# Altium PCB Driver.PcbDoc (part 3 of 4)
Units mm, origin at the board's own origin, x right, y up, seen from the top; angles counter-clockwise.
Board outline 200.2 x 290.2 mm, 2 copper layers (Top Layer, Bottom Layer), stack 1.371 mm thick; 539 components, 196 nets, 1470 pads, 343 vias.
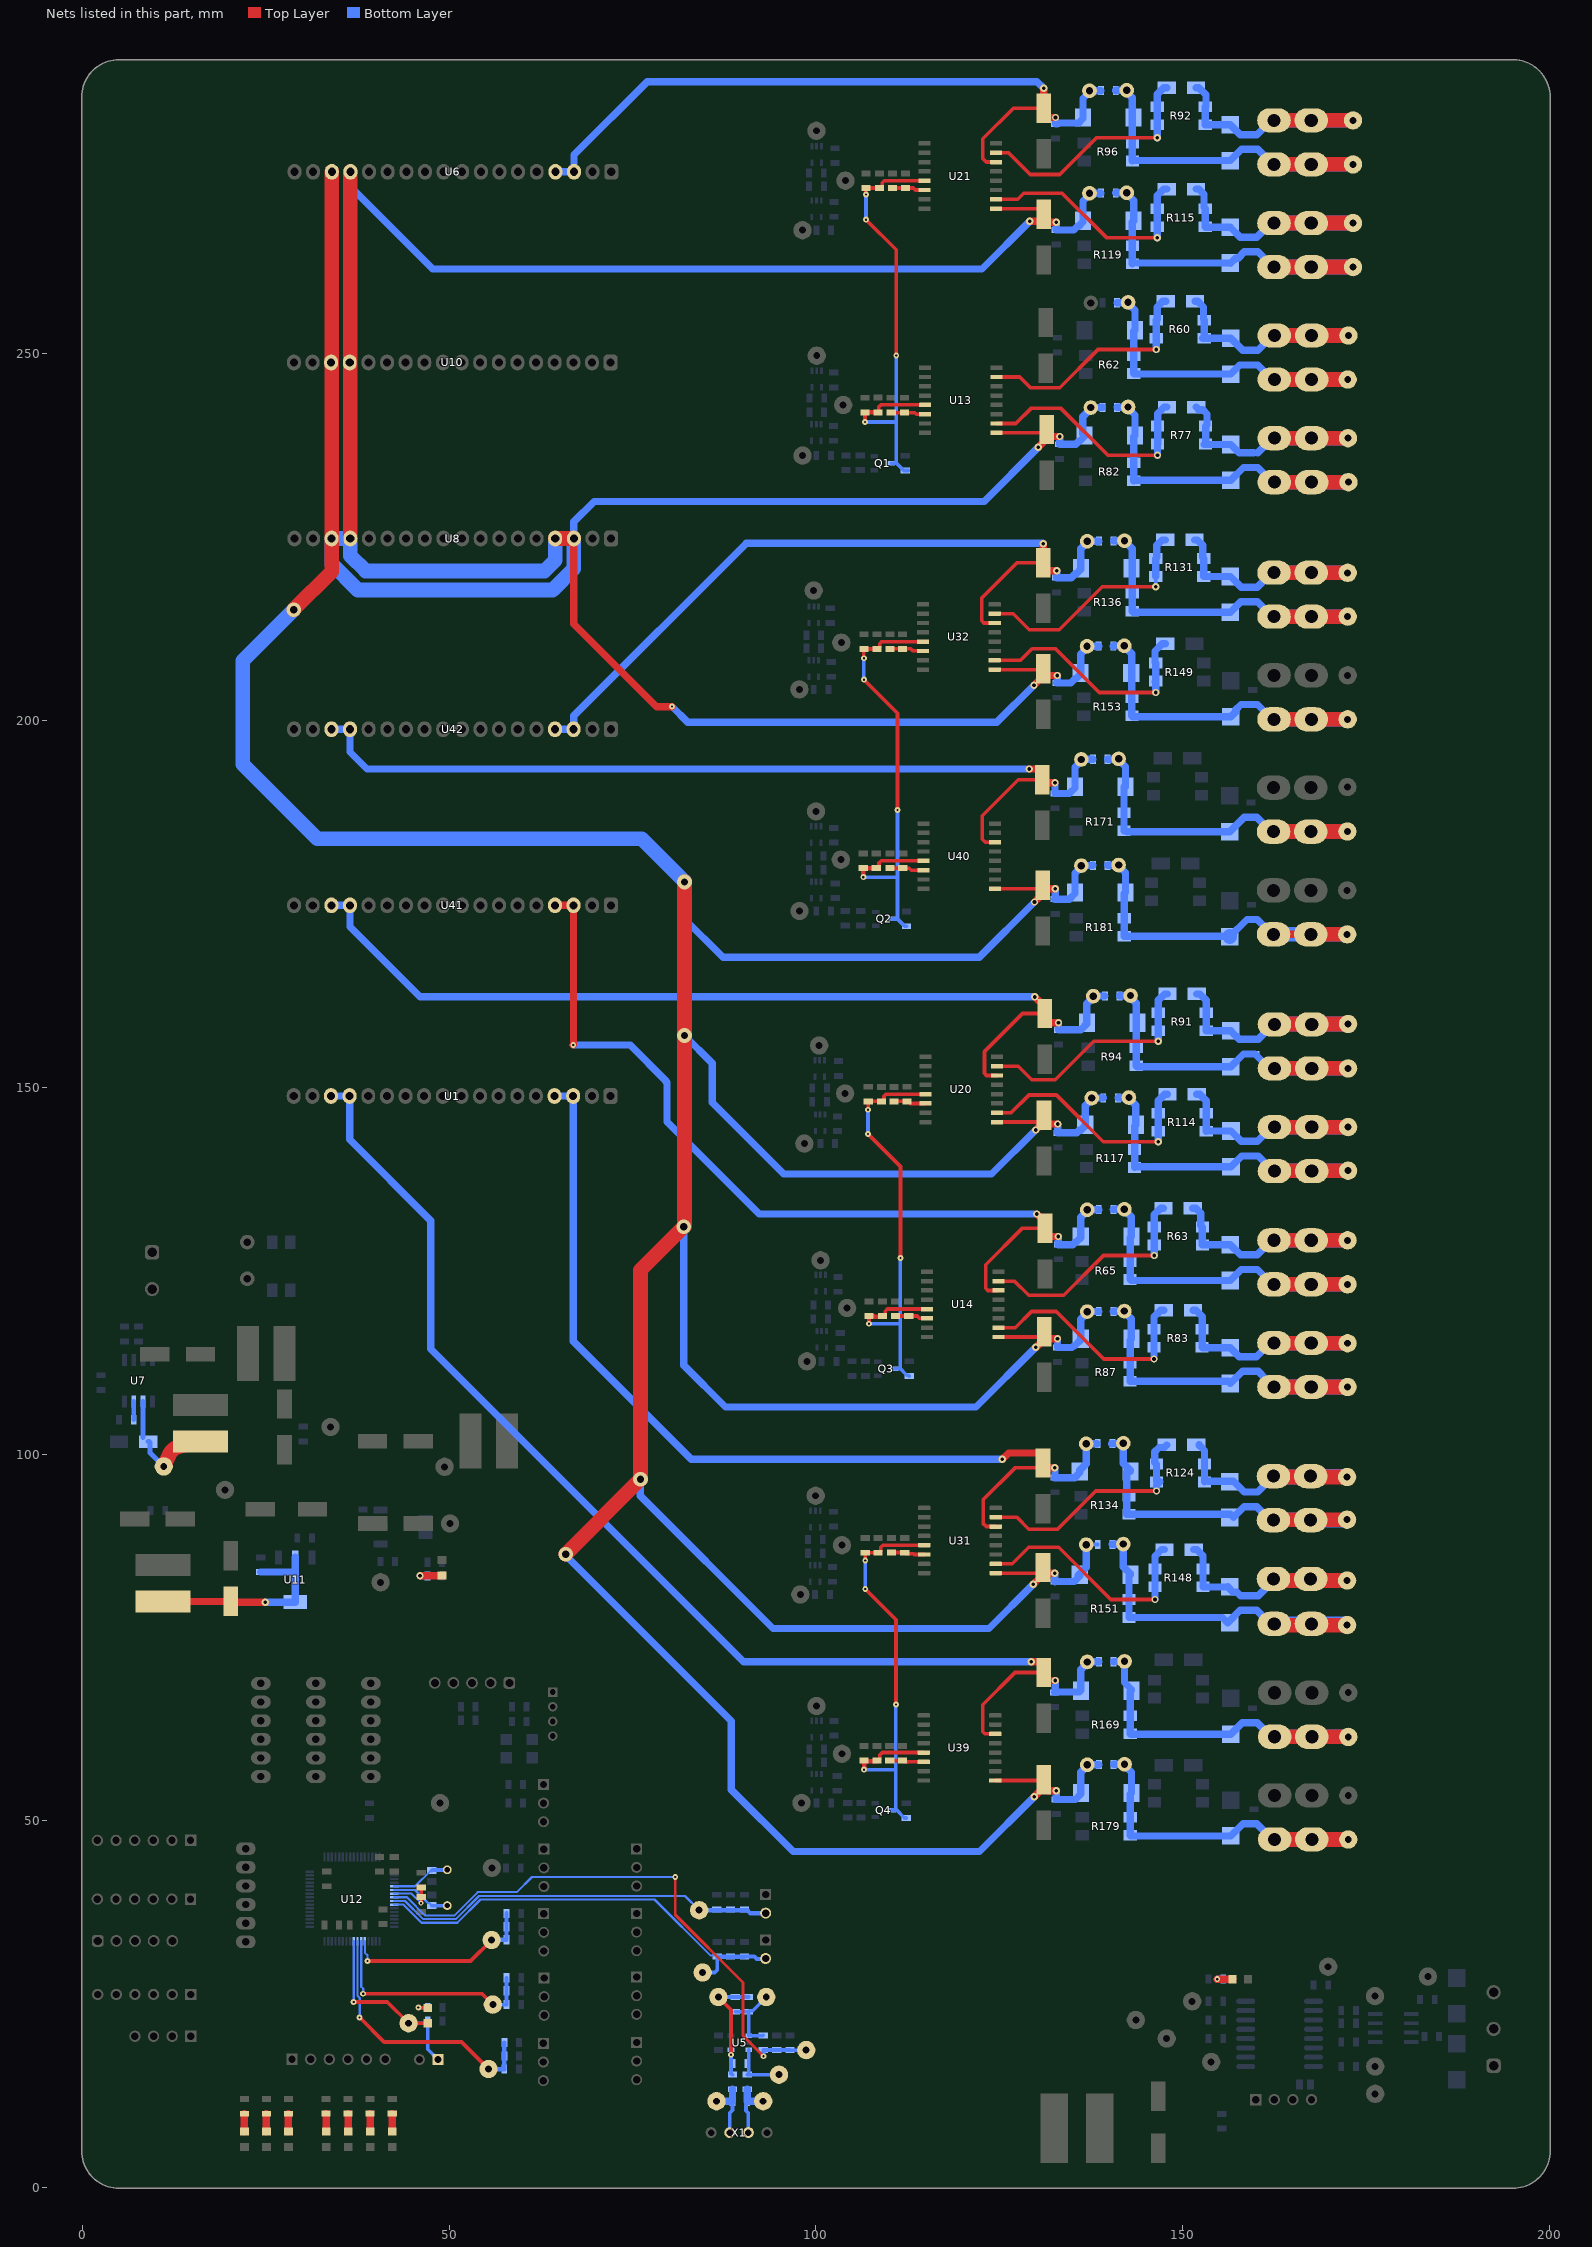
[diagram p3: the nets of this part, all layers, seen from the top]

## Via types
v1: diameter 0.8, hole 0.3, Top Layer to Bottom Layer, tented both sides, 172 vias
v2: diameter 1, hole 0.5, Top Layer to Bottom Layer, tented both sides, 129 vias
v3: diameter 0.8, hole 0.4, Top Layer to Bottom Layer, tented both sides, 25 vias
v4: diameter 2, hole 1, Top Layer to Bottom Layer, tented both sides, 11 vias
v5: diameter 0.8, hole 0.4, Top Layer to Bottom Layer, 3 vias
v6: diameter 1, hole 0.5, Top Layer to Bottom Layer, 1 vias
v7: diameter 0.7, hole 0.3, Top Layer to Bottom Layer, tented both sides, 1 vias
v8: diameter 1.5, hole 1, Top Layer to Bottom Layer, tented both sides, 1 vias

## Nets (pads, with @x,y where several pads share a name; then routed paths per layer and width w, separated by ;. In a path a pad name is that pad's centre, name@x,y a point inside that pad or via, vN(x,y) a via of type N, cw(c..) or ccw(c..) an arc to the next point about the centre after c; other vN are vias at no path point) (continued)
GND_-24V_2: C70.1 C71.2 C72.1 C73.2 C80.2 C82.1 C83.2 C84.1 C101.1 C102.1 C103.2 C104.2 C109.2 C110.2 C111.1 C112.1 C136.1 C137.2 C138.1 C139.2 C140.2 C141.1 C142.2 C143.1 C167.1 C168.2 C169.1 C170.2 C171.2 C172.1 C173.2 C174.1 U6.15 U6.16 U8.3 U8.4 U8.15 U8.16 U10.15 U10.16 U13.9 U14.9 U20.9 U21.9 U31.9 U32.9 U39.9 U40.9 VD8.2 VD9.2 VD16.2 VD17.2 VD26.2 VD27.2 VD34.2 VD35.2 | length 1160.1
  Top Layer w0.5: U32.9@124.375,206.949 130.867,206.949 C139.2@131,207.082 ; U40.9@124.428,177.069 C170.2@130.47,177.069 ; U39.9@124.449,55.5 C168.2@130.597,55.5 ; U31.9@124.519,83.77 130.204,83.77 C137.2@130.829,84.395 ; U21.9@124.565,269.788 C104.2@130.49,269.788 ; U13.9@124.637,239.223 131.019,239.223 C71.2@131.472,239.676 ; U20.9@124.689,145.264 130.354,145.264 C103.2@131.104,146.014 ; U14.9@124.891,115.959 130.403,115.959 C73.2@131.126,116.682 C73.2@131.126,116.484 ; v2(129.975,114.575) v2@130.019,114.575 ; C137.2@130.954,84.27 130.954,84.52 C137.2@130.954,84.53 ; C73.2@131.126,115.682 C73.2@131.126,116.484 ; C73.2@131.876,115.734 C73.2@131.126,116.484
  Top Layer w1: v4(28.825,215.125) v4@28.825,215.15 ; U6.16@33.98,274.795 U6.16@34,274.815 ; U6.15@36.52,274.795 U6.15@36.54,274.815 ; U8.3@67,224.815 67,213.175 78.275,201.9 80.35,201.9 v1(80.375,201.925) ; v2(129.136,268.048) 130.686,268.048 C104.2@131.05,268.413 ; v2(129.65,82.275) 130.405,83.03 130.713,83.03 131.454,83.77 v2(132.559,83.77) ; v2(129.725,204.825) 130.482,205.582 130.5,205.582 131,206.082 C139.2@131,206.644 ; v2(129.75,53.28) 130.835,54.365 131.074,54.365 C168.2@131.074,55.603 ; v2(129.79,175.254) 130.433,175.897 130.433,177.032 130.47,177.069 C170.2@130.933,177.532 131.396,177.069 v2(132.623,177.069) ; v2(129.961,144.189) 130.459,144.687 130.604,144.687 131.104,145.187 131.104,146.014 C103.2@131.104,146.187 ; v2@130.019,114.575 C73.2@131.126,115.682 ; v2(130.329,237.278) 130.972,237.921 130.972,239.176 C71.2@131.019,239.223 ; C137.2@130.954,84.27 C137.2@131.3,83.925 ; C139.2@131,207.082 C139.2@131,206.644 ; C104.2@131.05,269.021 C104.2@131.05,268.413 ; C168.2@131.074,54.603 131.574,54.103 v2(132.766,54.103) ; C103.2@131.234,145.359 131.604,144.989 v2(132.974,144.989) ; C71.2@131.472,239.676 131.472,239.218 131.972,238.718 v2(133.222,238.718) ; C73.2@131.876,115.734 v2(132.926,115.734) ; v2(132.78,267.913) 131.55,267.913 C104.2@131.05,268.413 ; v2(132.88,206.144) 131.5,206.144 C139.2@131,206.644
  Top Layer w2: v4@28.825,215.15 33.98,220.305 U8.16@33.98,224.815 U6.16@33.98,274.795 ; U8.15@36.52,224.815 U6.15@36.52,274.795 ; U8.4@64.46,224.815 U8.3@67,224.815 ; v4(65.9,86.35) 65.9,86.375 v4(76.075,96.55) 76.075,125.075 82.075,131.075 v4(82.075,157.075) v4(82.075,178)
  Bottom Layer w0.5: VD26.2@136.839,87.66 136.851,87.673 138.401,87.673 C141.1@138.414,87.685
  Bottom Layer w1: U6.15@36.54,274.815 36.54,272.76 47.75,261.55 122.637,261.55 v2(129.136,268.048) ; v4(65.9,86.35) 65.9,86.186 88.48,63.606 88.48,54.239 96.889,45.83 122.3,45.83 v2(129.75,53.28) ; U8.3@67,224.815 67,227.1 69.775,229.875 122.927,229.875 v2(130.329,237.278) ; v4(76.075,96.55) 76.068,96.543 76.068,94.307 94.15,76.225 123.6,76.225 v2(129.65,82.275) ; v1(80.375,201.925) 82.55,199.75 124.65,199.75 v2(129.725,204.825) ; v4(81.975,130.975) 81.975,112.125 87.675,106.425 121.825,106.425 v2(129.975,114.575) ; v4(82.075,157.075) 85.875,153.275 85.875,147.925 95.625,138.175 123.947,138.175 v2(129.961,144.189) ; v4(82.075,178) 82.025,177.95 82.025,173.025 87.325,167.725 122.261,167.725 v2(129.79,175.254) ; v2(132.559,83.77) 132.559,82.63 C136.1@132.584,82.605 ; C169.1@132.573,175.654 C169.1@132.623,175.654 ; v2(132.623,177.069) C169.1@132.623,175.654 ; C136.1@132.709,82.63 135.209,82.63 135.964,83.385 C140.2@135.964,83.535 ; v2(132.766,54.103) 132.766,52.923 C167.1@132.774,52.915 135.384,52.915 136.124,53.655 136.124,56.607 136.999,57.482 VD34.2@136.999,57.65 137.011,57.663 138.561,57.663 C172.1@138.574,57.675 ; v2(132.78,267.913) 132.78,266.893 C102.1@132.77,266.883 135.16,266.883 135.67,267.393 135.82,267.393 136.42,267.993 C110.2@136.42,268.143 136.42,270.84 137.295,271.715 VD17.2@137.295,271.888 137.307,271.9 138.858,271.9 C112.1@138.87,271.912 ; v2(132.88,206.144) 132.88,205.144 C138.1@132.85,205.114 134.721,205.114 135.34,205.733 135.49,205.733 136.09,206.333 C142.2@136.09,206.483 136.09,209.085 136.965,209.96 VD27.2@136.965,210.128 136.977,210.14 138.528,210.14 C143.1@138.54,210.153 ; v2(132.926,115.734) C72.1@132.926,114.529 134.901,114.529 135.106,114.734 135.256,114.734 136.106,115.584 C83.2@136.106,115.734 136.106,118.381 136.981,119.256 VD9.2@136.981,119.424 136.993,119.436 138.543,119.436 C84.1@138.556,119.449 ; v2(132.974,144.989) 132.974,143.819 C101.1@133.004,143.789 135.538,143.789 135.894,144.145 136.124,144.145 136.724,144.745 136.724,147.486 137.599,148.361 VD16.2@137.599,148.534 137.611,148.546 139.161,148.546 C111.1@139.174,148.559 ; v2(133.222,238.718) 133.222,237.678 135.402,237.678 135.842,238.118 135.992,238.118 136.592,238.718 C80.2@136.592,238.868 136.392,239.068 136.392,241.43 137.481,242.519 VD8.2@137.481,242.673 137.494,242.685 139.044,242.685 C82.1@139.056,242.697 ; C140.2@135.744,83.465 136.839,84.56 VD26.2@136.839,87.66 ; C174.1@137.763,180.254 137.75,180.241 136.2,180.241 VD35.2@136.188,180.229 136.188,180.056 135.313,179.181 C173.2@135.313,176.564 135.313,176.414 134.553,175.654 C169.1@132.623,175.654
  Bottom Layer w2: v4(28.825,215.125) 21.875,208.175 21.875,194.075 32.05,183.9 76.275,183.9 82.075,178.1 v4(82.075,178) ; U8.4@64.46,224.815 64.46,221.86 63,220.4 38.6,220.4 36.52,222.48 U8.15@36.52,224.815 U8.16@33.98,224.815 33.98,221.353 37.533,217.8 64.1,217.8 67,220.7 U8.3@67,224.815
GND_-24V_3: C86.1 C88.2 C92.2 C94.1 U6.3 U6.4 U21.14 VD13.2 | length 103.7
  Top Layer w0.5: U21.14@124.565,276.138 123.237,276.138 122.755,276.62 122.755,279.312 126.925,283.483 130.55,283.483 C88.2@131.05,283.483 131.05,282.973 C88.2@131.8,282.223
  Top Layer w1: C88.2@131.05,283.483 v2(131.05,286.2) ; C88.2@131.8,282.223 v2(132.66,282.223)
  Bottom Layer w0.5: v2(132.66,282.223) v2@132.67,282.213 ; C86.1@132.67,281.352 C86.1@132.68,281.343
  Bottom Layer w1: U6.4@64.48,274.815 U6.3@67.02,274.815 67.02,277.12 77,287.1 130.15,287.1 v2(131.05,286.2) ; v2@132.67,282.213 132.67,281.352 C86.1@132.68,281.343 ; C86.1@132.9,281.343 133.03,281.473 135.82,281.473 136.42,282.073 136.42,284.81 137.295,285.685 VD13.2@137.295,285.858 137.307,285.87 138.858,285.87 C94.1@138.87,285.882
GND_-24V_4: C115.1 C117.2 C122.2 C123.1 U32.14 U42.3 U42.4 VD23.2 | length 109.3
  Top Layer w0.5: U32.14@124.375,213.299 122.898,213.299 122.605,213.591 122.605,216.718 127.398,221.512 130.5,221.512 C117.2@131,221.512
  Top Layer w1: v2(130.975,224.125) 130.975,221.537 C117.2@131,221.512 131,220.944 131.5,220.444 v2(132.85,220.444)
  Bottom Layer w1: U42.4@64.43,198.815 U42.3@66.97,198.815 66.99,198.835 66.99,200.644 90.496,224.15 130.95,224.15 v2(130.975,224.125) ; v2(132.85,220.444) 132.85,219.524 C115.1@132.81,219.484 134.82,219.484 135.37,220.034 135.52,220.034 136.116,220.629 C122.2@136.116,220.779 ; C122.2@136.12,220.784 136.12,223.401 136.995,224.276 VD23.2@136.995,224.449 137.007,224.461 138.558,224.461 C123.1@138.57,224.473
GND_-24V_5: C149.1 C150.2 C153.2 C154.1 U40.14 U42.15 U42.16 VD31.2 | length 129.6
  Top Layer w0.5: U40.14@124.428,183.419 123.108,183.419 122.693,183.834 122.693,187.034 127.601,191.942 C150.2@130.873,191.942 ; C150.2@130.19,193.604 130.873,192.921 C150.2@130.873,191.942 ; C150.2@131.311,191.504 C150.2@130.873,191.942
  Top Layer w1: v2(129.1,193.4) C150.2@129.987,193.4 ; C150.2@131.311,191.504 v2(132.603,191.504)
  Bottom Layer w1: U42.16@33.95,198.815 U42.15@36.49,198.815 36.49,195.71 38.8,193.4 v2(129.1,193.4) ; v2(132.603,191.504) 132.593,191.494 C149.1@132.593,190.054 134.543,190.054 134.703,190.214 134.713,190.214 135.313,190.814 135.313,193.651 136.188,194.526 VD31.2@136.188,194.699 136.2,194.711 137.75,194.711 C154.1@137.763,194.724
GND_-24V_6: C59.1 C60.2 C63.2 C66.1 U14.14 U41.3 U41.4 VD5.2 | length 128.2
  Top Layer w0.5: U14.14@124.891,122.309 123.449,122.309 123.156,122.602 123.156,125.819 128.104,130.767 C60.2@131.236,130.767 131.236,131.614 C60.2@130.747,132.103
  Top Layer w1: U41.4@64.42,174.815 U41.3@66.96,174.815 66.96,155.81 v1(66.925,155.775) ; v2(130.093,132.724) 130.55,132.267 130.736,132.267 130.747,132.256 C60.2@130.747,132.103 ; C60.2@131.236,130.767 131.236,130.159 131.736,129.659 v2(133.046,129.659)
  Bottom Layer w1: v1(66.925,155.775) 74.675,155.775 79.55,150.9 79.55,150.844 79.705,150.689 79.705,145.295 92.276,132.724 v2(130.093,132.724) ; v2(133.046,129.659) 133.046,128.569 C59.1@133.056,128.559 135.006,128.559 135.356,128.909 135.506,128.909 136.106,129.509 C63.2@136.106,129.659 136.106,132.266 136.981,133.141 VD5.2@136.981,133.314 136.993,133.326 138.543,133.326 C66.1@138.556,133.339
GND_-24V_7: C85.1 C87.2 C90.2 C93.1 U20.14 U41.15 U41.16 VD12.2 | length 134.5
  Top Layer w0.5: U20.14@124.689,151.614 123.267,151.614 122.974,151.907 122.974,154.869 128.172,160.067 C87.2@131.194,160.067 ; C87.2@130.358,161.817 130.444,161.817 131.194,161.067 C87.2@131.194,160.067 ; C87.2@131.944,158.799 131.194,159.549 C87.2@131.194,160.067
  Top Layer w1: v2(129.85,162.325) C87.2@130.358,161.817 ; C87.2@131.944,158.799 v2(133.074,158.799)
  Bottom Layer w0.5: C85.1@133.064,157.839 C85.1@133.069,157.844 ; v2@133.069,158.794 v2(133.074,158.799)
  Bottom Layer w1: U41.16@33.94,174.815 U41.15@36.48,174.815 36.48,171.895 46.05,162.325 v2(129.85,162.325) ; C85.1@133.064,157.839 136.134,157.839 136.944,158.649 136.944,161.386 137.819,162.261 VD12.2@137.819,162.434 137.831,162.446 139.381,162.446 C93.1@139.394,162.459 ; C85.1@133.069,157.844 v2@133.069,158.794
GND_-24V_8: C113.1 C114.2 C118.2 C121.1 U1.3 U1.4 U31.14 VD22.2 | length 136.2
  Top Layer w0.5: U31.14@124.519,90.12 123.209,90.12 122.794,90.535 122.794,93.775 127.134,98.115 130.276,98.115 C114.2@130.954,98.793
  Top Layer w1: v2(125.4,99.275) 126.275,100.15 130.454,100.15 130.954,99.65 C114.2@130.954,98.793 ; C114.2@130.97,98.809 130.97,98.619 131.454,98.135 v2(132.554,98.135)
  Bottom Layer w1: U1.4@64.37,148.815 U1.3@66.91,148.815 66.91,115.365 83,99.275 v2(125.4,99.275) ; v2(132.554,98.135) 132.591,98.098 132.591,96.81 C113.1@132.574,96.793 135.272,96.793 135.964,97.485 C118.2@135.964,97.635 ; C118.2@135.964,97.785 136.839,98.66 VD22.2@136.839,101.4 ; VD22.2@136.731,101.413 138.281,101.413 C121.1@138.294,101.425
GND_-24V_9: C147.1 C148.2 C151.2 C152.1 U1.15 U1.16 U39.14 VD30.2 | length 173.1
  Top Layer w0.5: U39.14@124.369,61.85 124.354,61.865 123.027,61.865 122.734,62.158 122.734,65.815 127.142,70.223 C148.2@131.074,70.223
  Top Layer w1: v2(129.375,71.7) 130.574,71.7 131.074,71.2 C148.2@131.074,70.223 131.074,69.623 131.574,69.123 v2(132.615,69.123)
  Bottom Layer w1: U1.16@33.89,148.815 U1.15@36.43,148.815 36.43,142.895 47.5,131.825 47.5,114.325 90.125,71.7 v2(129.375,71.7) ; C147.1@132.538,67.509 132.615,67.587 v2(132.615,69.123) ; C147.1@132.538,67.575 135.94,67.575 C151.2@136.124,67.759 136.124,70.621 136.999,71.496 VD30.2@136.999,71.664 137.011,71.676 138.561,71.676 C152.1@138.574,71.689
NetC1_2: C1.2 R1.2 R4.1 TP1.1 U12.23 | length 36.8
  Top Layer w0.5: v1(37.782,23.207) 41.132,19.857 51.682,19.857 TP1.1@55.372,16.167
  Bottom Layer w0.3: U12.23@37.507,33.576 37.507,26.157 37.809,25.855 37.809,23.234 v1(37.782,23.207)
  Bottom Layer w0.6: TP1.1@55.372,16.167 55.381,16.157 57.501,16.157 R1.2@57.511,16.147 57.522,16.158 C1.2@57.522,17.957 R4.1@57.522,19.787
NetC2_2: C2.2 R2.2 R5.1 TP2.1 U12.22 | length 31.1
  Top Layer w0.5: v1(38.277,26.419) 54.48,26.419 TP2.1@55.948,24.951
  Bottom Layer w0.3: U12.22@38.007,33.576 38.007,27.382 38.277,27.112 v1(38.277,26.419)
  Bottom Layer w0.5: TP2.1@55.948,24.951 R2.2@57.826,24.951 ; R2.2@57.826,24.951 R5.1@57.826,28.62
NetC3_2: C3.2 R3.2 R6.1 TP3.1 U12.21 | length 26.6
  Top Layer w0.5: v1(38.853,30.882) 52.921,30.882 TP3.1@55.793,33.754
  Bottom Layer w0.3: U12.21@38.507,33.576 38.507,32.007 38.855,31.659 v1(38.853,30.882) v1(38.853,30.882)
  Bottom Layer w0.6: TP3.1@55.793,33.754 55.808,33.769 57.808,33.769 R3.2@57.823,33.784 C3.2@57.823,35.552 R6.1@57.823,37.384
NetC26_1: C26.1 R51.1 TP26.1 X1.2 | length 8.3
  Bottom Layer w0.5: X1.2@88.252,7.493 88.252,10.172 88.63,10.55 C26.1@88.63,11.775
  Bottom Layer w1: TP26.1@86.45,11.775 C26.1@88.63,11.775 88.625,11.78 88.625,13.4 R51.1@88.62,13.405
NetC26_2: C26.2 R49.1 TP22.1 X1.3 | length 8.5
  Top Layer w1: TP22.1@92.81,11.59 TP22.1@92.81,11.775
  Bottom Layer w0.5: C26.2@90.63,11.775 90.48,11.625 90.48,11.112 90.475,11.107 90.475,10.489 90.792,10.172 X1.3@90.792,7.493
  Bottom Layer w1: R49.1@90.63,13.405 C26.2@90.63,11.775 TP22.1@92.81,11.775
NetC27_1: C27.1 C29.1 R51.2 R53.1 TP25.1 U5.4 | length 16.2
  Top Layer w0.5: TP25.1@86.703,25.975 88.43,24.248 v1(88.43,18.105)
  Bottom Layer w0.5: TP25.1@86.703,25.975 C29.1@90.81,25.975 ; U5.4@88.43,18.805 v1(88.43,18.105) 88.43,15.555 88.58,15.405 R51.2@88.62,15.405
NetC27_2: C27.2 R49.2 TP21.1 U5.3 | length 7.8
  Bottom Layer w0.5: R49.2@90.63,15.405 90.68,15.405 90.83,15.555 90.83,16.932 U5.3@90.83,18.805 ; R49.2@90.64,15.395 TP21.1@94.97,15.395
NetC28_2: C28.2 R50.1 R52.1 TP24.1 U12.8 | length 77.7
  Top Layer w0.4: v1(80.825,42.35) 80.825,37.2 90.048,27.977 90.048,20.712 v1(92.855,17.906)
  Bottom Layer w0.3: U12.8@42.507,39.576 44.263,39.576 46.759,37.08 50.687,37.08 53.889,40.282 59.232,40.282 61.282,42.332 80.807,42.332 v1(80.825,42.35) ; R50.1@92.81,18.755 R50.1@92.855,18.711
  Bottom Layer w0.5: R50.1@92.81,18.755 R52.1@94.65,18.755 96.463,18.755 C28.2@96.469,18.749 96.471,18.747 TP24.1@98.68,18.745 TP24.1@98.68,18.745 ; v1(92.855,17.906) R50.1@92.855,18.711
NetC29_2: C29.2 R50.2 R53.2 TP23.1 U5.1 | length 10.3
  Bottom Layer w0.5: R53.2@89,23.975 C29.2@90.81,23.975 ; R50.2@92.81,20.755 92.76,20.705 U5.1@90.83,20.705 90.83,23.955 C29.2@90.81,23.975 ; TP23.1@93.23,25.975 91.38,24.125 90.96,24.125 C29.2@90.81,23.975
NetC36_1: C36.1 U7.3 | length 2.5
  Bottom Layer w0.6: C36.1@7.005,104.691 U7.3@7.005,107.184
NetC48_2: C48.2 R58.1 U12.7 | length 6.3
  Top Layer w0.5: v7(46.177,38.777) 46.186,38.786 46.186,39.719 46.195,39.728 R58.1@46.195,40.881
  Bottom Layer w0.3: U12.7@42.507,40.076 44.878,40.076 v7(46.177,38.777)
NetC50_1: C50.1 C53.2 L7.1 U11.2 | length 29
  Top Layer w1: L7.1@10.96,79.899 20.175,79.899 C50.1@20.21,79.934 20.325,79.819 v2(24.935,79.819)
  Bottom Layer w1: C53.2@24.31,83.919 28.775,83.919 29.02,83.674 ; v2(24.935,79.819) U11.2@29.02,79.819 29.02,83.674 ; U11.2@29.02,85.919 29.02,83.674
NetC55_1: C55.1 U12.5 Y1.2 | length 8.2
  Bottom Layer w0.3: U12.5@42.507,41.076 45.348,41.076 47.475,43.203 C55.1@47.627,43.203
  Bottom Layer w0.5: C55.1@47.627,43.203 47.73,43.306 Y1.2@49.737,43.306
NetC56_1: C56.1 U12.6 Y1.1 | length 8.1
  Bottom Layer w0.3: U12.6@42.507,40.576 45.339,40.576 47.128,38.788 47.298,38.788 C56.1@47.627,38.459 C56.1@47.66,38.426
  Bottom Layer w0.5: C56.1@47.66,38.426 Y1.1@49.737,38.426
NetC61_1: C61.1 C62.2 J16.1 R61.1 R62.1 TP39.1 VD2.1 VD4.1 | length 52.2
  Top Layer w2: J16.1@162.502,246.498 J16.1@167.582,246.498 TP39.1@172.502,246.498
  Bottom Layer w1: C62.2@141.056,256.955 141.081,256.98 142.531,256.98 VD4.1@142.556,257.006 142.556,256.908 143.506,255.958 C61.1@143.506,253.233 143.331,253.058 R62.1@143.331,249.763 R62.1@143.331,247.313 143.407,247.237 VD2.1@156.542,247.237 157.783,248.478 R61.1@159.692,248.478 160.22,248.478 162.2,246.498 J16.1@162.502,246.498
  Bottom Layer w2: J16.1@162.502,246.498 J16.1@167.582,246.498 TP39.1@172.502,246.498
NetC63_1: C63.1 C66.2 J17.1 R64.1 R65.1 TP44.1 VD3.1 VD5.1 | length 52.8
  Top Layer w2: J17.1@162.446,123.149 J17.1@167.526,123.149 TP44.1@172.486,123.149
  Bottom Layer w1: C66.2@140.556,133.339 140.581,133.364 142.031,133.364 VD5.1@142.056,133.389 142.056,133.291 143.006,132.341 C63.1@143.006,129.659 142.831,129.484 R65.1@142.831,126.249 R65.1@142.831,123.799 142.962,123.668 VD3.1@156.496,123.668 157.997,125.169 R64.1@159.296,125.169 160.203,125.169 162.223,123.149 J17.1@162.446,123.149
  Bottom Layer w2: J17.1@162.446,123.149 J17.1@167.526,123.149 TP44.1@172.486,123.149
NetC64_2: C64.2 C97.2 Q1.3 R73.2 R76.2 R108.2 U13.5 U21.5 | length 66.9
  Top Layer w0.5: C64.2@106.683,242.012 R73.2@108.148,242.012 ; v1(106.825,271.725) 106.836,271.736 106.836,272.591 C97.2@106.847,272.603 108.892,272.603 109.042,272.753 109.042,273.305 109.335,273.598 U21.5@114.815,273.598 ; v1(106.836,268.286) 110.95,264.173 v1(110.95,249.75) ; R73.2@108.473,242.022 108.582,242.13 108.582,242.758 108.857,243.033 U13.5@114.887,243.033
  Top Layer w0.6: v1(106.693,240.7) 106.693,242.022 R73.2@108.473,242.022
  Bottom Layer w0.5: v1(106.693,240.7) 110.961,240.7 ; v1(106.825,271.725) 106.825,268.298 v1(106.836,268.286) ; Q1.3@110.25,235.097 110.775,235.097 110.961,235.097 ; v1(110.95,249.75) 110.961,249.739 110.961,240.7 ; R76.2@112.186,234.097 R76.2@111.961,234.097 ; R76.2@112.588,234.097 R76.2@111.961,234.097 ; 110.961,235.097 111.811,234.247 R76.2@111.961,234.097 ; 110.961,235.097 110.961,240.7
NetC65_2: C65.2 R72.2 U13.6 | length 4.7
  Top Layer w0.5: R72.2@110.263,242.012 110.307,241.968 113.462,241.968 113.667,241.763 U13.6@114.887,241.763
NetC68_2: C68.2 C95.2 Q3.3 R75.2 R106.2 R132.2 U14.5 U20.5 | length 63.2
  Top Layer w0.5: v1(107.1,143.639) 111.525,139.214 v1(111.525,126.725) ; v1(107.1,146.95) 107.122,146.972 107.122,148.057 C95.2@107.144,148.079 108.904,148.079 R106.2@108.934,148.049 109.138,148.049 109.288,148.199 109.288,148.781 109.581,149.074 U20.5@114.939,149.074 ; C68.2@107.238,118.824 107.966,118.824 ; R75.2@109.29,118.824 109.44,118.974 109.44,119.476 109.733,119.769 U14.5@115.141,119.769
  Top Layer w0.6: v1(107.236,117.775) v1(107.236,117.775) 107.237,118.823 C68.2@107.238,118.824 ; 107.966,118.724 109.19,118.724 R75.2@109.29,118.824
  Bottom Layer w0.5: v1(107.1,143.639) v1(107.1,146.95) ; v1(107.236,117.775) 111.498,117.775 ; Q3.3@110.716,111.654 111.498,111.654 ; v1(111.525,126.725) 111.498,126.698 111.498,117.775 ; R132.2@112.723,110.654 112.623,110.754 112.398,110.754 111.498,111.654 ; 111.498,111.654 111.498,117.775
NetC69_2: C69.2 R74.2 U14.6 | length 4.4
  Top Layer w0.5: R74.2@110.868,118.824 C69.2@112.645,118.824 113.781,118.824 114.084,118.521 115.119,118.521 U14.6@115.141,118.499
NetC80_1: C80.1 C82.2 J21.1 R81.1 R82.1 TP51.1 VD6.1 VD8.1 | length 53
  Top Layer w2: J21.1@162.502,232.498 J21.1@167.582,232.498 TP51.1@172.592,232.498
  Bottom Layer w1: C82.2@141.056,242.697 141.081,242.722 142.531,242.722 VD8.1@142.556,242.748 142.556,242.598 143.492,241.662 C80.1@143.492,238.868 143.317,238.693 R82.1@143.317,235.153 R82.1@143.317,232.703 143.371,232.757 VD6.1@156.542,232.757 158.283,234.498 R81.1@159.672,234.498 160.24,234.498 162.24,232.498 J21.1@162.502,232.498
  Bottom Layer w2: J21.1@162.502,232.498 J21.1@167.582,232.498 TP51.1@172.592,232.498
NetC81_2: C81.2 P6.2 R78.1 R89.1 TP50.1 U12.9 | length 54
  Bottom Layer w0.3: U12.9@42.507,39.076 43.975,39.076 46.451,36.6 50.9,36.6 54.061,39.761 82.143,39.761 TP50.1@84.088,37.815
  Bottom Layer w0.6: TP50.1@84.088,37.815 R89.1@90.279,37.815 ; R89.1@90.279,37.831 90.604,37.831 90.62,37.815 90.632,37.815 91.022,37.425 P6.2@93.153,37.425
NetC83_1: C83.1 C84.2 J22.1 R86.1 R87.1 TP52.1 VD7.1 VD9.1 | length 53
  Top Layer w2: J22.1@162.446,109.149 J22.1@167.526,109.149 TP52.1@172.486,109.149
  Bottom Layer w1: C84.2@140.556,119.449 140.581,119.474 142.031,119.474 VD9.1@142.056,119.499 142.056,119.401 143.006,118.451 C83.1@143.006,115.734 142.831,115.559 R87.1@142.831,112.364 R87.1@142.831,109.914 156.2,109.914 VD7.1@156.486,109.628 158.147,111.289 R86.1@159.426,111.289 160.306,111.289 161.37,110.224 161.37,110.212 162.434,109.149 J22.1@162.446,109.149
  Bottom Layer w2: J22.1@162.446,109.149 J22.1@167.526,109.149 TP52.1@172.486,109.149
NetC89_2: C89.2 P7.2 R90.1 R103.1 TP61.1 U12.10 | length 60.3
  Bottom Layer w0.3: U12.10@42.507,38.576 43.763,38.576 46.219,36.12 51.098,36.12 54.26,39.281 77.994,39.281 85.649,31.626 86.659,31.626 C89.2@86.8,31.485
  Bottom Layer w0.5: TP61.1@84.563,29.327 86.225,29.327 86.548,29.65 C89.2@86.548,31.485
  Bottom Layer w0.6: C89.2@86.8,31.485 88.368,31.485 90.248,31.485 R103.1@90.268,31.505 91.613,31.505 91.952,31.167 93.085,31.167 P7.2@93.143,31.225
NetC90_1: C90.1 C93.2 J25.1 R93.1 R94.1 TP62.1 VD10.1 VD12.1 | length 51.9
  Top Layer w2: J25.1@162.514,152.579 J25.1@167.594,152.579 TP62.1@172.554,152.579
  Bottom Layer w1: C93.2@141.394,162.459 141.419,162.484 142.869,162.484 VD12.1@142.894,162.509 142.894,162.238 143.669,161.463 R94.1@143.669,155.404 R94.1@143.669,152.954 143.815,152.808 VD10.1@156.554,152.808 158.295,154.549 R93.1@159.854,154.549 J25.1@161.824,152.579
  Bottom Layer w2: J25.1@161.824,152.579 J25.1@162.514,152.579 J25.1@167.594,152.579 TP62.1@172.554,152.579
NetC92_1: C92.1 C94.2 J26.1 R95.1 R96.1 TP63.1 VD11.1 VD13.1 | length 53.8
  Top Layer w2: J26.1@162.45,275.823 J26.1@167.53,275.823 TP63.1@173.226,275.823
  Bottom Layer w1: C94.2@140.87,285.882 140.895,285.907 142.345,285.907 VD13.1@142.37,285.933 142.37,285.662 143.145,284.887 R96.1@143.145,278.738 R96.1@143.145,276.288 143.199,276.342 VD11.1@156.49,276.342 158.021,277.873 R95.1@159.5,277.873 160.237,277.873 162.287,275.823 J26.1@162.45,275.823
  Bottom Layer w2: J26.1@162.45,275.823 J26.1@167.53,275.823 TP63.1@173.226,275.823
NetC96_2: C96.2 R105.2 U20.6 | length 4.4
  Top Layer w0.5: R105.2@110.654,148.049 110.684,148.079 C96.2@112.404,148.079 112.629,148.079 112.904,147.804 U20.6@114.939,147.804
NetC98_2: C98.2 R107.2 U21.6 | length 4.5
  Top Layer w0.5: R107.2@110.45,272.603 113.254,272.603 113.529,272.328 U21.6@114.815,272.328
NetC109_1: C109.1 C111.2 J30.1 R116.1 R117.1 TP69.1 VD14.1 VD16.1 | length 52.2
  Top Layer w2: J30.1@162.514,138.579 162.564,138.629 TP69.1@172.554,138.629
  Bottom Layer w1: C111.2@141.174,148.559 141.199,148.584 142.649,148.584 VD16.1@142.674,148.609 142.674,148.511 143.624,147.561 C109.1@143.624,144.895 143.449,144.72 R117.1@143.449,141.524 R117.1@143.449,139.074 143.533,139.158 VD14.1@156.584,139.158 158.055,140.629 R116.1@159.564,140.629 160.301,140.629 162.351,138.579 J30.1@162.514,138.579
  Bottom Layer w2: J30.1@162.514,138.579 162.564,138.629 TP69.1@172.554,138.629
NetC110_1: C110.1 C112.2 J31.1 R118.1 R119.1 TP70.1 VD15.1 VD17.1 | length 53.5
  Top Layer w2: J31.1@162.45,261.823 J31.1@167.53,261.823 TP70.1@173.226,261.823
  Bottom Layer w1: C112.2@140.87,271.912 140.895,271.937 142.345,271.937 VD17.1@142.37,271.963 142.37,271.843 143.32,270.893 C110.1@143.32,268.143 143.145,267.968 R119.1@143.145,264.738 R119.1@143.145,262.288 R119.1@143.279,262.422 ; R119.1@143.859,262.382 VD15.1@156.5,262.382 ; VD15.1@156.53,262.352 157.22,263.042 157.556,263.042 158.417,263.903 R118.1@159.59,263.903 160.267,263.903 162.347,261.823 J31.1@162.45,261.823
  Bottom Layer w2: J31.1@162.45,261.823 J31.1@167.53,261.823 TP70.1@173.226,261.823
NetC118_1: C118.1 C121.2 J35.1 R133.1 R134.1 TP79.1 VD20.1 VD22.1 | length 53.2
  Top Layer w2: J35.1@162.374,90.985 162.444,91.055 TP79.1@172.414,91.055
  Bottom Layer w1: C121.2@140.294,101.425 140.319,101.45 141.769,101.45 VD22.1@141.794,101.475 ; VD22.1@141.914,101.475 141.914,98.735 142.864,97.785 C118.1@142.864,97.635 ; C118.1@142.389,97.635 142.389,91.8 156.528,91.8 156.934,91.394 158.365,92.825 160.113,92.825 161.953,90.985 J35.1@162.374,90.985 J35.1@162.444,91.055
  Bottom Layer w2: J35.1@162.444,91.055 J35.1@167.454,91.055 ; J35.1@167.454,90.985 TP79.1@172.344,90.985
NetC122_1: C122.1 C123.2 J36.1 R135.1 R136.1 TP83.1 VD21.1 VD23.1 | length 52.5
  Top Layer w2: J36.1@162.46,214.174 J36.1@167.54,214.174 TP83.1@172.5,214.174
  Bottom Layer w1: C123.2@140.57,224.473 140.595,224.498 142.045,224.498 VD23.1@142.07,224.524 142.07,224.503 143.135,223.438 R136.1@143.135,217.339 R136.1@143.135,214.889 143.261,214.763 VD21.1@156.51,214.763 157.931,216.184 R135.1@159.73,216.184 160.207,216.184 162.217,214.174 J36.1@162.46,214.174
  Bottom Layer w2: J36.1@162.46,214.174 J36.1@167.54,214.174 TP83.1@172.5,214.174
NetC124_2: C124.2 C155.2 Q4.3 R145.2 R154.2 R173.2 U31.5 U39.5 | length 62.8
  Top Layer w0.5: C155.2@106.354,58.035 107.313,58.035 ; v1(106.734,81.619) 110.925,77.427 v1(110.925,65.875) ; v1(106.734,85.475) C124.2@106.734,86.555 R145.2@108.484,86.555 R145.2@108.688,86.555 ; R173.2@108.565,58.205 108.715,58.355 108.715,58.968 109.008,59.26 ; R145.2@108.709,86.555 R145.2@108.688,86.555 ; 109.058,59.31 U39.5@114.619,59.31 ; U31.5@114.769,87.58 109.13,87.58 108.838,87.287 108.838,86.705 R145.2@108.688,86.555
  Top Layer w0.6: v1(106.575,56.975) 106.613,57.013 C155.2@106.613,58.035 ; 107.313,58.105 R173.2@108.383,58.105
  Bottom Layer w0.5: v1(106.575,56.975) 110.904,56.975 ; v1(106.734,81.619) v1(106.734,85.475) ; v1(110.925,65.875) 110.904,65.854 110.904,56.975 ; R154.2@112.309,50.39 112.084,50.39 111.984,50.49 111.004,51.47 Q4.3@110.379,51.47 110.904,51.47 110.904,53.22 110.904,56.975
NetC125_2: C125.2 R144.2 U31.6 | length 4.6
  Top Layer w0.5: R144.2@110.314,86.575 112.084,86.575 112.254,86.405 113.314,86.405 113.409,86.31 U31.6@114.769,86.31
NetC126_2: C126.2 C159.2 Q2.3 R104.2 R147.2 R175.2 U32.5 U40.5 | length 65.5
  Top Layer w0.5: v1(106.54,205.576) 111.125,200.991 v1(111.125,187.8) ; v1(106.54,208.5) C126.2@106.54,209.758 ; C159.2@106.623,179.879 R175.2@107.897,179.879 ; C126.2@106.808,209.764 R147.2@108.315,209.764 ; R175.2@108.222,179.879 108.447,179.879 108.597,180.029 108.597,180.586 108.89,180.879 U40.5@114.678,180.879 ; R147.2@108.54,209.764 108.69,209.914 108.69,210.471 108.983,210.764 114.62,210.764 U32.5@114.625,210.759
  Top Layer w0.6: v1(106.463,178.65) C159.2@106.463,179.879 R175.2@108.222,179.879
  Bottom Layer w0.5: v1(106.463,178.65) 111.123,178.65 ; v1(106.54,205.576) v1(106.54,208.5) ; Q2.3@110.441,172.957 111.123,172.957 ; v1(111.125,187.8) 111.123,187.798 111.123,178.65 ; R104.2@112.348,171.957 112.123,171.957 112.023,172.057 111.123,172.957 ; 111.123,172.957 111.123,178.65
NetC127_2: C127.2 R146.2 U32.6 | length 4.7
  Top Layer w0.5: R146.2@110.095,209.764 110.125,209.794 112.923,209.794 113.181,209.536 114.578,209.536 U32.6@114.625,209.489
NetC140_1: C140.1 C141.2 J39.1 R150.1 R151.1 TP87.1 VD24.1 VD26.1 | length 53.6
  Top Layer w1: J39.1@162.484,76.855 J39.1@162.654,76.685
  Top Layer w2: J39.1@162.654,76.685 TP87.1@172.414,76.685
  Bottom Layer w1: C141.2@140.414,87.685 140.439,87.71 141.889,87.71 VD26.1@141.914,87.735 141.914,84.635 142.864,83.685 C140.1@142.864,83.535 142.689,83.36 R151.1@142.689,80.17 ; R151.1@142.484,80.17 142.689,79.965 R151.1@142.689,77.72 155.438,77.72 156.144,77.014 157.825,78.695 160.112,78.695 161.952,76.855 J39.1@162.484,76.855 ; TP87.1@172.244,76.855 TP87.1@172.414,76.685
  Bottom Layer w2: J39.1@162.484,76.855 J39.1@167.564,76.855 TP87.1@172.244,76.855
NetC142_1: C142.1 C143.2 J40.1 R152.1 R153.1 TP88.1 VD25.1 VD27.1 | length 52.7
  Top Layer w2: J40.1@162.46,200.174 J40.1@167.54,200.174 TP88.1@172.5,200.174
  Bottom Layer w1: C143.2@140.54,210.153 140.565,210.178 142.015,210.178 VD27.1@142.04,210.203 142.04,210.152 143.075,209.117 R153.1@143.075,203.098 R153.1@143.075,200.648 143.2,200.523 VD25.1@156.55,200.523 157.25,201.223 157.25,201.484 157.949,202.184 160.207,202.184 162.217,200.174 J40.1@162.46,200.174
  Bottom Layer w2: J40.1@162.46,200.174 J40.1@167.54,200.174 TP88.1@172.5,200.174
NetC151_1: C151.1 C152.2 J44.1 R168.1 R169.1 TP100.1 VD28.1 VD30.1 | length 53.1
  Top Layer w1: J44.1@162.534,61.465 J44.1@162.554,61.445
  Top Layer w2: J44.1@162.554,61.445 TP100.1@172.574,61.445
  Bottom Layer w1: C152.2@140.574,71.689 140.599,71.714 142.049,71.714 VD30.1@142.074,71.739 142.074,68.859 143.024,67.909 C151.1@143.024,67.759 142.849,67.584 R169.1@142.849,64.344 R169.1@142.849,61.894 142.928,61.814 VD28.1@156.574,61.814 158.115,63.355 R168.1@159.524,63.355 160.162,63.355 162.052,61.465 J44.1@162.534,61.465
  Bottom Layer w2: J44.1@162.534,61.465 162.554,61.445 TP100.1@172.574,61.445
NetC153_1: C153.1 C154.2 J45.1 R170.1 R171.1 TP101.1 VD29.1 VD31.1 | length 53.4
  Top Layer w1: J45.1@162.393,184.854 J45.1@162.413,184.874
  Top Layer w2: J45.1@162.413,184.874 TP101.1@172.453,184.874
  Bottom Layer w1: C154.2@139.763,194.724 139.788,194.749 141.238,194.749 VD31.1@141.263,194.774 141.263,194.664 142.213,193.714 C153.1@142.213,190.964 ; R171.1@142.008,184.999 R171.1@142.008,187.449 C153.1@142.008,190.964 ; R171.1@142.449,184.843 VD29.1@156.433,184.843 158.414,186.824 R170.1@159.333,186.824 160.1,186.824 162.07,184.854 J45.1@162.393,184.854
  Bottom Layer w2: J45.1@162.393,184.854 162.413,184.874 TP101.1@172.453,184.874
NetC156_2: C156.2 R172.2 U39.6 | length 4.6
  Top Layer w0.5: R172.2@110.064,58.205 C156.2@111.824,58.205 111.974,58.055 112.427,58.055 112.492,57.99 ; 112.542,58.04 U39.6@114.619,58.04
NetC162_2: C162.2 R174.2 U40.6 | length 4.7
  Top Layer w0.5: R174.2@110.103,179.879 C162.2@111.843,179.879 112.738,179.879 113.008,179.609 U40.6@114.678,179.609
NetC171_1: C171.1 C172.2 J50.1 R178.1 R179.1 TP104.1 VD32.1 VD34.1 | length 53.1
  Top Layer w1: J50.1@162.534,47.465 J50.1@162.544,47.455
  Top Layer w2: J50.1@162.544,47.455 TP104.1@172.574,47.455
  Bottom Layer w1: C172.2@140.574,57.675 140.599,57.7 142.049,57.7 VD34.1@142.074,57.725 142.074,57.59 143.024,56.64 C171.1@143.024,53.805 142.849,53.63 R179.1@142.849,50.47 R179.1@142.849,48.02 142.925,47.944 VD32.1@156.574,47.944 158.215,49.585 R178.1@159.714,49.585 160.076,49.585 J50.1@162.196,47.465
  Bottom Layer w2: J50.1@162.196,47.465 J50.1@162.534,47.465 J50.1@167.614,47.465 167.624,47.455 TP104.1@172.574,47.455
NetC173_1: C173.1 C174.2 J51.1 R180.1 R181.1 TP105.1 VD33.1 VD35.1 | length 54
  Top Layer w1: J51.1@162.393,170.854 J51.1@167.473,170.854
  Top Layer w2: J51.1@167.473,170.854 TP105.1@172.433,170.854
  Bottom Layer w1: C174.2@139.763,180.254 139.788,180.279 141.238,180.279 VD35.1@141.263,180.304 141.263,180.206 142.213,179.256 C173.1@142.213,176.564 142.038,176.389 R181.1@142.038,173.039 R181.1@142.038,170.589 VD33.1@156.397,170.589 ; VD33.1@156.433,170.553 158.764,172.884 R180.1@159.403,172.884 160.16,172.884 162.19,170.854 J51.1@162.393,170.854
  Bottom Layer w2: VD33.1@156.397,170.589 VD33.1@156.433,170.553 ; J51.1@162.393,170.854 J51.1@167.473,170.854 TP105.1@172.433,170.854
NetD1_1: D1.1 R7.1 | length 2.5
  Top Layer w1: D1.1@28.081,7.626 R7.1@28.081,10.076
NetD2_1: D2.1 R8.1 | length 2.5
  Top Layer w1: D2.1@25.081,7.626 R8.1@25.081,10.076
NetD3_1: D3.1 R9.1 | length 2.5
  Top Layer w1: D3.1@22.081,7.626 R9.1@22.081,10.076
NetD4_1: D4.1 R10.1 | length 2.5
  Top Layer w1: D4.1@42.231,7.651 R10.1@42.231,10.101
NetD5_1: D5.1 R11.1 | length 2.5
  Top Layer w1: D5.1@39.231,7.651 R11.1@39.231,10.101
NetD6_1: D6.1 R12.1 | length 2.5
  Top Layer w1: D6.1@36.231,7.651 R12.1@36.231,10.101
NetD7_1: D7.1 R13.1 | length 2.5
  Top Layer w1: D7.1@33.231,7.651 R13.1@33.231,10.101
NetD8_1: D8.1 R39.1 | length 2.9
  Top Layer w1: v1(154.711,28.417) D8.1@156.818,28.417
  Bottom Layer w1: v1(154.711,28.417) 155.508,28.417 R39.1@155.528,28.437
NetD10_1: D10.1 L5.1 TP28.1 U7.2 | length 15.8
  Top Layer w2: TP28.1@11.09,98.319 11.833,99.919 cw(c13.647,99.077) 13.192,101.025 13.98,101.209 L5.1@16.12,101.709
  Bottom Layer w0.7: D10.1@8.275,102.259 U7.2@8.275,107.184 ; D10.1@8.98,101.709 9.08,101.709 9.23,101.559 9.23,100.179 TP28.1@11.09,98.319
NetD11_1: D11.1 R55.1 | length 4
  Top Layer w1: v2(46.025,83.435) D11.1@49.035,83.435
  Bottom Layer w1: v2(46.025,83.435) R55.1@46.965,83.435
NetD12_1: D12.1 R60.1 U13.15 | length 31.9
  Top Layer w0.5: U13.15@124.637,246.843 127.777,246.843 129.252,245.368 133.247,245.368 138.457,250.578 v2(146.382,250.578)
  Bottom Layer w0.5: R60.1@146.382,252.118 R60.1@146.397,252.133
  Bottom Layer w1: v2(146.382,250.578) R60.1@146.382,252.118 ; R60.1@146.397,252.133 R60.1@146.397,254.583 146.514,254.7 146.514,256.39 147.272,257.148 D12.1@147.672,257.148
NetD12_2: D12.2 J14.1 R60.2 R61.2 TP35.1 VD2.2 | length 37.3
  Top Layer w2: J14.1@162.502,252.498 J14.1@167.582,252.498 TP35.1@172.592,252.498
  Bottom Layer w1: D12.2@151.672,257.148 152.072,257.148 152.83,256.39 152.83,254.7 R60.2@152.947,254.583 R60.2@152.947,252.133 R60.2@152.962,252.118 ; R60.2@152.722,252.118 VD2.2@156.542,252.118 158.182,250.478 R61.2@159.692,250.478 160.26,250.478 162.28,252.498 J14.1@162.502,252.498
  Bottom Layer w2: J14.1@162.502,252.498 J14.1@167.582,252.498 TP35.1@172.592,252.498
NetD13_1: D13.1 R63.1 U14.15 | length 31.5
  Top Layer w0.5: U14.15@124.891,123.579 127.076,123.579 129.006,121.649 133.786,121.649 139.211,127.074 v2(146.136,127.074)
  Bottom Layer w1: v2(146.136,127.074) R63.1@146.136,128.5 146.136,132.67 146.991,133.525 D13.1@147.391,133.525
NetD13_2: D13.2 J15.1 R63.2 R64.2 TP36.1 VD3.2 | length 37.1
  Top Layer w2: J15.1@162.446,129.149 J15.1@167.526,129.149 TP36.1@172.486,129.149
  Bottom Layer w1: D13.2@151.391,133.525 151.791,133.525 152.453,132.864 152.453,131.175 152.678,130.95 R63.2@152.686,130.95 R63.2@152.686,128.5 152.734,128.549 VD3.2@156.496,128.549 157.876,127.169 R64.2@159.296,127.169 160.163,127.169 162.143,129.149 J15.1@162.446,129.149
  Bottom Layer w2: J15.1@162.446,129.149 J15.1@167.526,129.149 TP36.1@172.486,129.149
NetD14_1: D14.1 R77.1 U13.10 | length 32.5
  Top Layer w0.5: U13.10@124.637,240.493 127.257,240.493 129.322,242.558 133.422,242.558 139.822,236.158 v2@146.332,236.158
  Bottom Layer w0.5: R77.1@146.572,237.694 R77.1@146.581,237.703
  Bottom Layer w1: v2(146.572,236.158) R77.1@146.572,237.694 ; R77.1@146.581,237.703 R77.1@146.581,240.153 146.581,241.863 147.106,242.388 147.456,242.738 D14.1@147.856,242.738
NetD14_2: D14.2 J19.1 R77.2 R81.2 TP45.1 VD6.2 | length 36.5
  Top Layer w2: J19.1@162.502,238.498 J19.1@167.582,238.498 TP45.1@172.542,238.498
  Bottom Layer w1: D14.2@151.856,242.738 152.206,242.388 152.726,242.388 153.312,241.802 153.312,240.334 R77.2@153.131,240.153 R77.2@153.131,237.703 R77.2@153.196,237.638 ; R77.2@152.956,237.638 VD6.2@156.542,237.638 157.682,236.498 R81.2@159.672,236.498 ; R81.2@160.24,236.498 162.24,238.498 J19.1@162.502,238.498
  Bottom Layer w2: J19.1@162.502,238.498 J19.1@167.582,238.498 TP45.1@172.542,238.498
NetD15_1: D15.1 R83.1 U14.10 | length 32.2
  Top Layer w0.5: U14.10@124.891,117.229 127.186,117.229 129.406,119.449 132.756,119.449 139.236,112.969 v2(146.101,112.969)
  Bottom Layer w1: v2(146.101,112.969) R83.1@146.101,114.574 R83.1@146.101,117.024 146.101,118.704 147.006,119.609 D15.1@147.406,119.609
NetD15_2: D15.2 J20.1 R83.2 R86.2 TP49.1 VD7.2 | length 37
  Top Layer w1: J20.1@162.446,115.149 J20.1@162.486,115.109
  Top Layer w2: J20.1@162.486,115.109 TP49.1@172.486,115.109
  Bottom Layer w1: D15.2@151.406,119.609 151.806,119.609 152.651,118.764 R83.2@152.651,114.574 152.716,114.509 VD7.2@156.486,114.509 157.706,113.289 R86.2@159.426,113.289 160.074,113.289 161.934,115.149 J20.1@162.446,115.149
  Bottom Layer w2: J20.1@162.446,115.149 162.486,115.109 TP49.1@172.486,115.109
NetD16_1: D16.1 R91.1 U20.15 | length 32.2
  Top Layer w0.5: U20.15@124.689,152.884 127.579,152.884 129.424,151.039 132.624,151.039 137.864,156.279 v2(146.684,156.279)
  Bottom Layer w0.5: R91.1@146.659,157.694 R91.1@146.663,157.69 ; v2@146.663,156.3 v2(146.684,156.279)
  Bottom Layer w1: R91.1@146.659,157.694 R91.1@146.659,160.144 146.659,161.854 147.534,162.729 D16.1@147.934,162.729 ; v2@146.663,156.3 R91.1@146.663,157.69
NetD16_2: D16.2 J23.1 R91.2 R93.2 TP56.1 VD10.2 | length 36.5
  Top Layer w1: J23.1@162.514,158.579 J23.1@162.574,158.639
  Top Layer w2: J23.1@162.574,158.639 TP56.1@172.554,158.639
  Bottom Layer w1: D16.2@151.934,162.729 152.334,162.729 153.209,161.854 R91.2@153.209,160.144 R91.2@153.209,157.694 156.549,157.694 VD10.2@156.554,157.689 157.694,156.549 R93.2@159.854,156.549 160.281,156.549 162.311,158.579 J23.1@162.514,158.579
  Bottom Layer w2: J23.1@162.514,158.579 162.574,158.639 TP56.1@172.554,158.639
NetD17_1: D17.1 R92.1 U21.15 | length 32.8
  Top Layer w0.5: U21.15@124.565,277.408 126.255,277.408 129.22,274.443 133.24,274.443 138.26,279.463 v2(146.535,279.463)
  Bottom Layer w1: v2(146.535,279.463) R92.1@146.535,281.218 R92.1@146.535,283.668 146.535,285.398 147.41,286.273 D17.1@147.81,286.273
NetD17_2: D17.2 J24.1 R92.2 R95.2 TP55.1 VD11.2 | length 38.2
  Top Layer w2: J24.1@162.45,281.823 J24.1@167.53,281.823 TP55.1@173.226,281.823
  Bottom Layer w1: D17.2@151.81,286.273 152.21,286.273 153.176,285.307 153.176,283.758 R92.2@153.085,283.668 R92.2@153.085,281.218 153.09,281.223 VD11.2@156.49,281.223 157.84,279.873 R95.2@159.5,279.873 160.137,279.873 162.087,281.823 J24.1@162.45,281.823
  Bottom Layer w2: J24.1@162.45,281.823 J24.1@167.53,281.823 TP55.1@173.226,281.823
NetD18_1: D18.1 R114.1 U20.10 | length 32.9
  Top Layer w0.5: U20.10@124.689,146.534 126.609,146.534 129.034,148.959 132.784,148.959 139.179,142.564 v2(146.659,142.564)
  Bottom Layer w1: v2(146.659,142.564) R114.1@146.659,144.024 R114.1@146.659,146.474 146.659,148.184 147.534,149.059 D18.1@147.934,149.059
NetD18_2: D18.2 J28.1 R114.2 R116.2 TP67.1 VD14.2 | length 36.6
  Top Layer w2: J28.1@162.514,144.579 J28.1@167.594,144.579 TP67.1@172.554,144.579
  Bottom Layer w1: D18.2@151.934,149.059 152.334,149.059 153.209,148.184 R114.2@153.209,144.024 153.224,144.039 VD14.2@156.584,144.039 157.994,142.629 R116.2@159.564,142.629 160.201,142.629 162.151,144.579 J28.1@162.514,144.579
  Bottom Layer w2: J28.1@162.514,144.579 J28.1@167.594,144.579 TP67.1@172.554,144.579
NetD19_1: D19.1 R115.1 U21.10 | length 32.2
  Top Layer w0.5: U21.10@124.565,271.058 127.515,271.058 128.345,271.888 133.563,271.888 139.608,265.843 v2(146.535,265.843)
  Bottom Layer w1: v2(146.535,265.843) R115.1@146.535,267.338 R115.1@146.535,269.788 146.535,271.588 147.41,272.463 D19.1@147.81,272.463
NetD19_2: D19.2 J29.1 R115.2 R118.2 TP68.1 VD15.2 | length 38.2
  Top Layer w2: J29.1@162.45,267.823 J29.1@167.53,267.823 TP68.1@173.226,267.823
  Bottom Layer w1: D19.2@151.81,272.463 152.21,272.463 152.912,271.761 152.912,269.961 R115.2@153.085,269.788 R115.2@153.085,267.338 153.16,267.263 VD15.2@156.5,267.263 ; VD15.2@156.52,267.223 157.84,265.903 R118.2@159.59,265.903 160.107,265.903 162.027,267.823 J29.1@162.45,267.823
  Bottom Layer w2: J29.1@162.45,267.823 J29.1@167.53,267.823 TP68.1@173.226,267.823
NetD20_1: D20.1 R124.1 U31.15 | length 32.5
  Top Layer w0.5: U31.15@124.519,91.39 127.399,91.39 129.024,89.765 132.924,89.765 138.134,94.975 v2(146.434,94.975)
  Bottom Layer w1: v2(146.434,94.975) 146.434,95.763 R124.1@146.914,96.243 ; R124.1@146.434,96.203 R124.1@146.434,98.653 146.42,98.653 146.195,98.878 146.195,100.313 146.78,100.898 147.479,100.898 D20.1@147.829,101.248
NetD20_2: D20.2 J32.1 R124.2 R133.2 TP77.1 VD20.2 | length 35.9
  Top Layer w2: J32.1@162.374,96.985 162.484,96.875 TP77.1@172.414,96.875
  Bottom Layer w1: D20.2@152.279,101.288 152.279,101.198 152.984,100.493 R124.2@152.984,96.203 ; R124.2@153.466,96.275 156.934,96.275 158.384,94.825 160.214,94.825 161.298,95.91 161.298,95.922 162.362,96.985 J32.1@162.374,96.985 J32.1@162.484,96.875
  Bottom Layer w2: J32.1@162.484,96.875 J32.1@167.454,96.875 ; J32.1@167.454,96.985 172.168,96.985 172.183,96.971 172.289,96.971 TP77.1@172.304,96.985
NetD21_1: D21.1 R131.1 U32.15 | length 32.4
  Top Layer w0.5: U32.15@124.375,214.569 126.895,214.569 129.1,212.364 133.18,212.364 139.05,218.234 v2(146.32,218.234)
  Bottom Layer w0.5: v2(146.32,218.234) 146.32,219.634 R131.1@146.33,219.644
  Bottom Layer w1: R131.1@146.33,219.644 R131.1@146.33,222.094 146.487,222.251 146.487,223.901 147.205,224.619 D21.1@147.605,224.619
NetD21_2: D21.2 J34.1 R131.2 R135.2 TP78.1 VD21.2 | length 36.9
  Top Layer w2: J34.1@162.46,220.174 162.49,220.144 TP78.1@172.5,220.144
  Bottom Layer w1: D21.2@151.605,224.619 152.005,224.619 152.723,223.901 152.723,222.251 R131.2@152.88,222.094 R131.2@152.88,219.644 VD21.2@156.51,219.644 157.97,218.184 R135.2@159.73,218.184 160.187,218.184 162.177,220.174 J34.1@162.46,220.174
  Bottom Layer w2: J34.1@162.46,220.174 162.49,220.144 TP78.1@172.5,220.144
NetD22_1: D22.1 R142.1 | length 2.6
  Top Layer w0.5: v1(45.797,24.536) 45.818,24.515 47.08,24.515 D22.1@47.087,24.508
  Bottom Layer w0.4: R142.1@47.076,24.524 R142.1@47.087,24.536
  Bottom Layer w0.5: v1(45.797,24.536) 47.064,24.536 R142.1@47.076,24.524
NetD22_2: D22.2 P9.1 R137.2 TP84.1 U12.24 | length 28.1
  Top Layer w0.5: v1(36.982,25.307) 41.576,25.307 TP84.1@44.475,22.408 D22.2@47.087,22.408
  Bottom Layer w0.3: v1(36.982,25.307) 37.007,25.332 U12.24@37.007,33.576
  Bottom Layer w0.5: TP84.1@44.475,22.408 46.937,22.408 R137.2@47.087,22.558 ; R137.2@47.087,22.696 R137.2@47.087,22.558 ; P9.1@48.487,17.456 47.087,18.856 R137.2@47.087,22.558
NetD23_1: D23.1 R148.1 U31.10 | length 33.2
  Top Layer w0.5: U31.10@124.519,85.04 126.759,85.04 129.004,87.285 133.094,87.285 140.209,80.17 v2(146.219,80.17)
  Bottom Layer w1: v2(146.219,80.17) R148.1@146.219,81.89 R148.1@146.219,84.34 146.219,86.08 147.124,86.985 D23.1@147.524,86.985
NetD23_2: D23.2 J37.1 R148.2 R150.2 TP85.1 VD24.2 | length 37
  Top Layer w2: J37.1@162.374,82.985 162.594,82.765 TP85.1@172.414,82.765
  Bottom Layer w1: D23.2@151.524,86.985 151.924,86.985 152.769,86.14 R148.2@152.769,84.34 R148.2@152.769,81.89 156.139,81.89 156.144,81.895 156.844,81.195 157.374,81.195 157.874,80.695 160.324,80.695 161.408,81.78 161.408,81.792 J37.1@162.472,82.855
  Bottom Layer w2: J37.1@162.574,82.765 J37.1@167.454,82.765 ; J37.1@167.454,82.985 167.674,82.765 TP85.1@172.414,82.765
NetD24_1: D24.1 R149.1 U32.10 | length 32.7
  Top Layer w0.5: U32.10@124.375,208.219 127.905,208.219 129.47,209.784 132.66,209.784 138.621,203.823 v2(146.335,203.823)
  Bottom Layer w0.5: R149.1@146.225,205.278 R149.1@146.335,205.389
  Bottom Layer w1: R149.1@146.225,205.278 146.335,205.167 v2(146.335,203.823) ; R149.1@146.335,205.389 R149.1@146.335,207.839 146.225,207.949 146.225,209.478 147.21,210.464 D24.1@147.61,210.464

## Text inside footprints (layer, text, board x,y; h text height)
U8: Top Overlay "-18V_1" at 63.949,222.875 h1.3 r270; Top Overlay "-18V_1" at 66.489,222.875 h1.3 r270; Top Overlay "+18V_1" at 69.029,222.875 h1.3 r270; Top Overlay "+18V_1" at 71.569,222.875 h1.3 r270; Top Overlay "+18V_2" at 28.39,223.154 h1.3 r270; Top Overlay "+18V_2" at 30.93,223.154 h1.3 r270; Top Overlay "-18V_2" at 33.47,223.154 h1.3 r270; Top Overlay "-18V_2" at 36.01,223.154 h1.3 r270; Top Overlay "+12V" at 53.356,222.058 h1.3 r270; Top Overlay "GND" at 45.737,221.418 h1.3 r270; Top Overlay "GND" at 48.277,221.418 h1.3 r270; Top Overlay "+12V" at 50.816,222.058 h1.3 r270; Bottom Overlay "+18V_2" at 28.39,216.388 h1.3 r270; Bottom Overlay "+18V_2" at 30.93,216.388 h1.3 r270; Bottom Overlay "-18V_2" at 33.47,216.388 h1.3 r270; Bottom Overlay "-18V_2" at 36.01,216.389 h1.3 r270; Bottom Overlay "GND" at 45.737,218.124 h1.3 r270; Bottom Overlay "GND" at 48.277,218.124 h1.3 r270; Bottom Overlay "+12V" at 50.816,217.484 h1.3 r270; Bottom Overlay "+12V" at 53.356,217.484 h1.3 r270; Bottom Overlay "-18V_1" at 63.949,216.667 h1.3 r270; Bottom Overlay "-18V_1" at 66.489,216.667 h1.3 r270; Bottom Overlay "+18V_1" at 69.029,216.667 h1.3 r270; Bottom Overlay "+18V_1" at 71.569,216.667 h1.3 r270
U10: Top Overlay "+12V" at 50.746,246.058 h1.3 r270; Top Overlay "GND" at 48.207,245.418 h1.3 r270; Top Overlay "GND" at 45.667,245.418 h1.3 r270; Top Overlay "+12V" at 53.286,246.058 h1.3 r270; Top Overlay "-18V_2" at 35.94,247.154 h1.3 r270; Top Overlay "-18V_2" at 33.4,247.154 h1.3 r270; Top Overlay "+18V_2" at 30.86,247.154 h1.3 r270; Top Overlay "+18V_2" at 28.32,247.154 h1.3 r270; Top Overlay "+18V_1" at 71.499,246.875 h1.3 r270; Top Overlay "+18V_1" at 68.959,246.875 h1.3 r270; Top Overlay "-18V_1" at 66.419,246.875 h1.3 r270; Top Overlay "-18V_1" at 63.879,246.875 h1.3 r270; Bottom Overlay "+18V_1" at 71.499,240.667 h1.3 r270; Bottom Overlay "+18V_1" at 68.959,240.667 h1.3 r270; Bottom Overlay "-18V_1" at 66.419,240.667 h1.3 r270; Bottom Overlay "-18V_1" at 63.879,240.667 h1.3 r270; Bottom Overlay "+12V" at 53.286,241.484 h1.3 r270; Bottom Overlay "+12V" at 50.746,241.484 h1.3 r270; Bottom Overlay "GND" at 48.207,242.124 h1.3 r270; Bottom Overlay "GND" at 45.667,242.124 h1.3 r270; Bottom Overlay "-18V_2" at 35.94,240.389 h1.3 r270; Bottom Overlay "-18V_2" at 33.4,240.388 h1.3 r270; Bottom Overlay "+18V_2" at 30.86,240.388 h1.3 r270; Bottom Overlay "+18V_2" at 28.32,240.388 h1.3 r270